# Altium PCB Charge Control-v2.0.0.PcbDoc
Units mil, origin at the board's own origin, x right, y up, seen from the top; angles counter-clockwise.
Board outline 984.25 x 1181.1 mil, 2 copper layers (Top Layer, Bottom Layer), stack 61.811 mil thick; 17 components, 11 nets, 51 pads, 37 vias.
Unrouted connection lines stored in the file: 10.
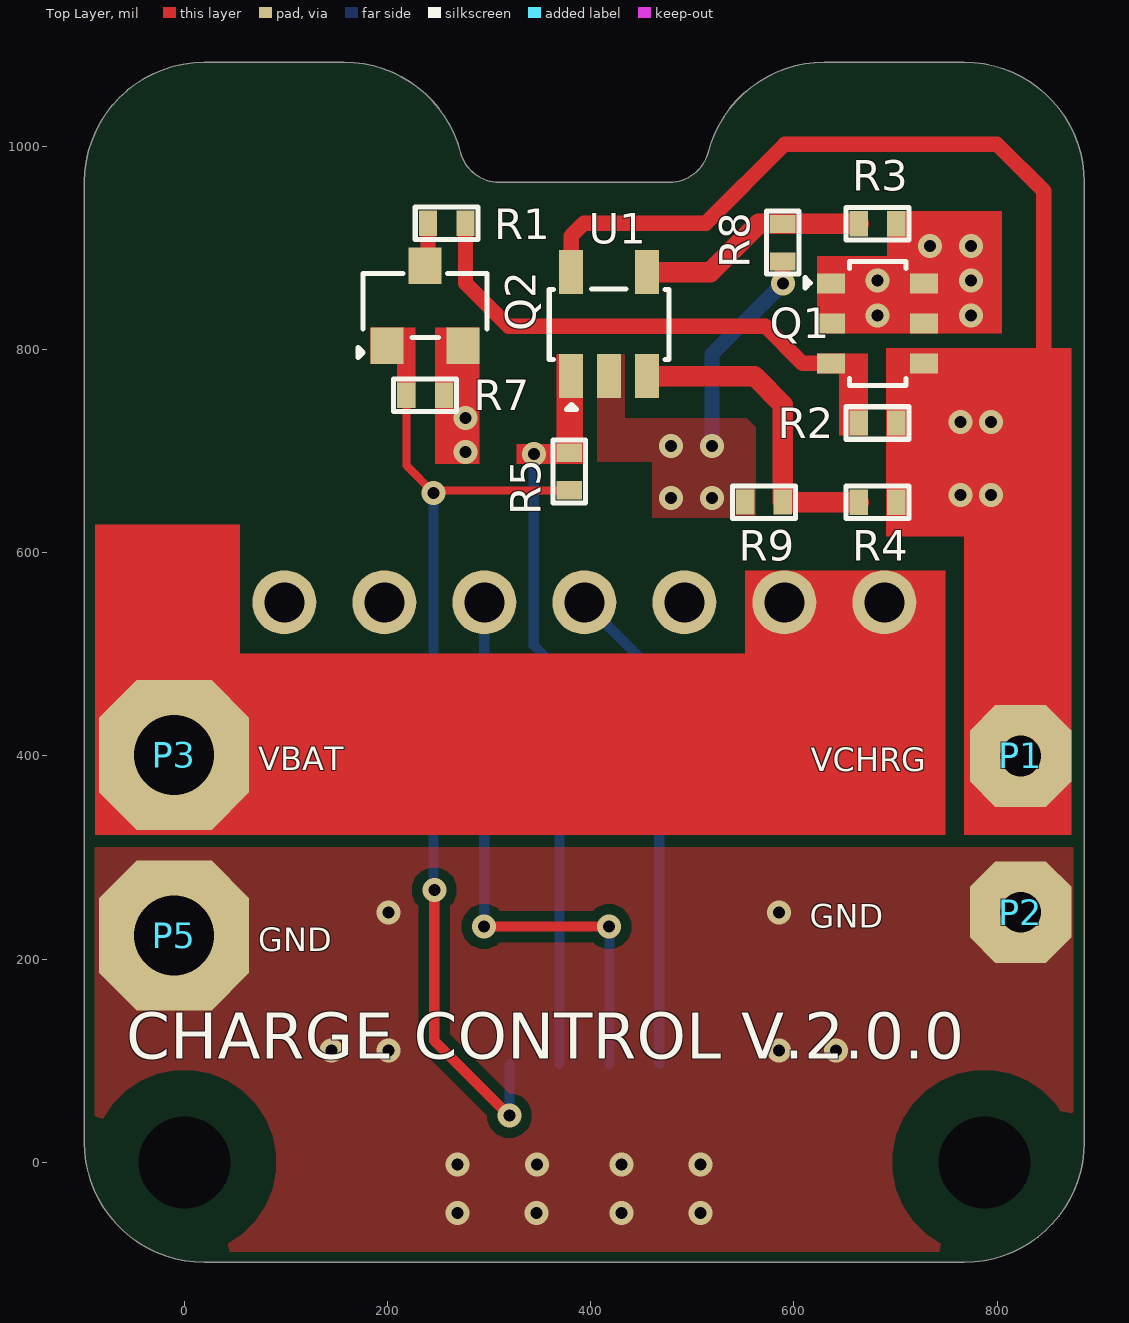
[diagram p0: Top Layer view]
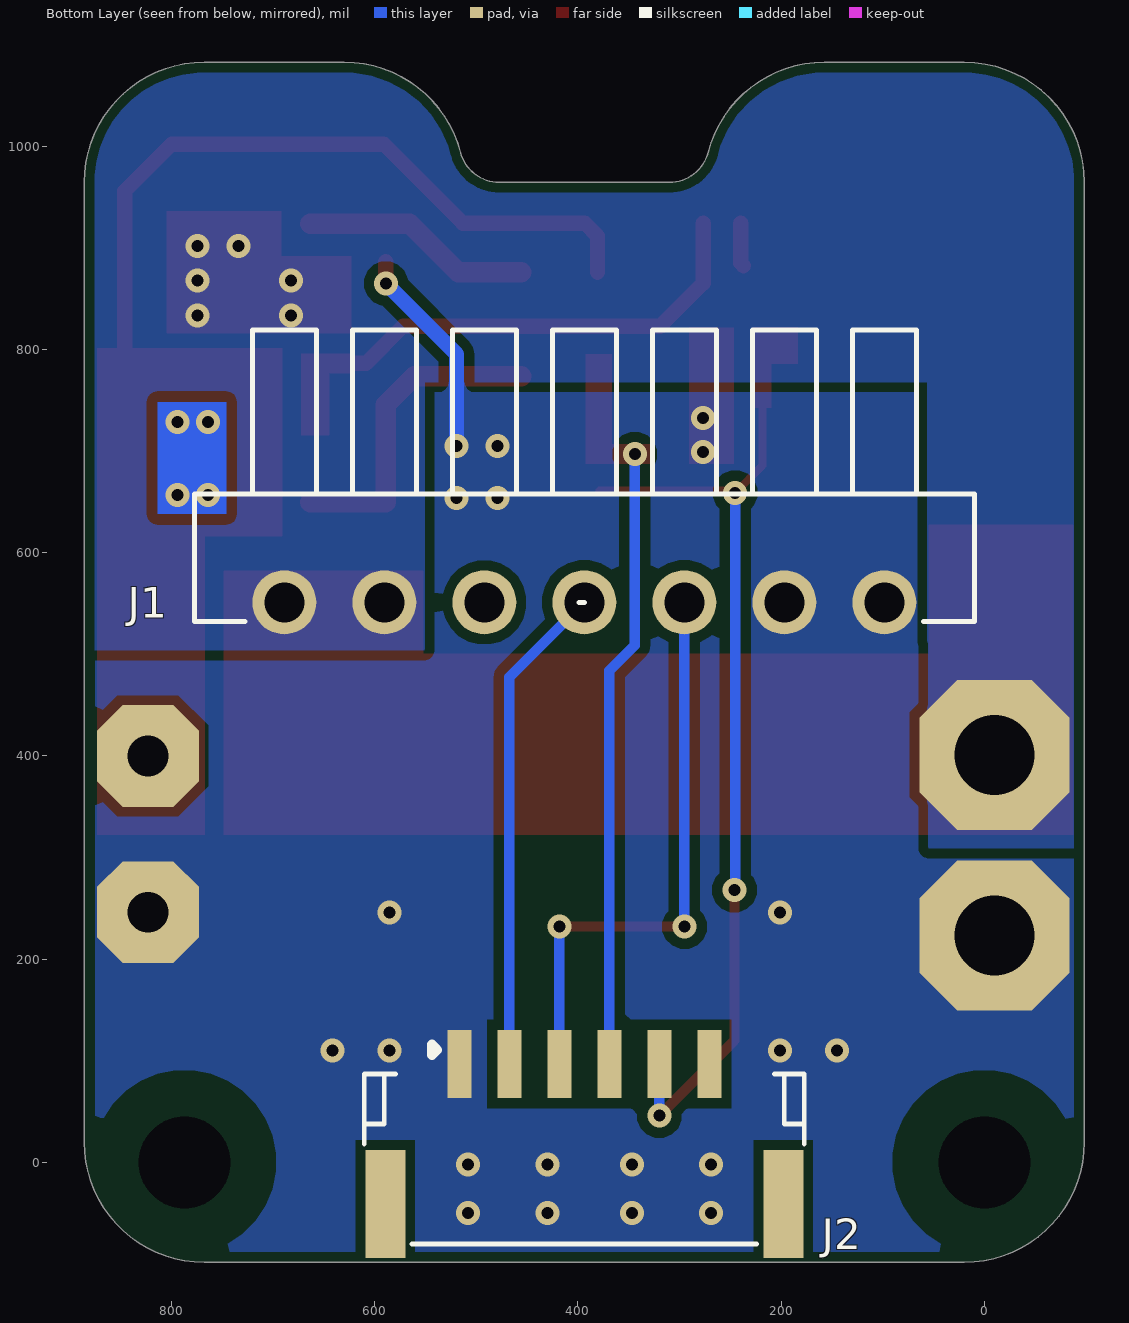
[diagram p1: Bottom Layer view, seen from below]
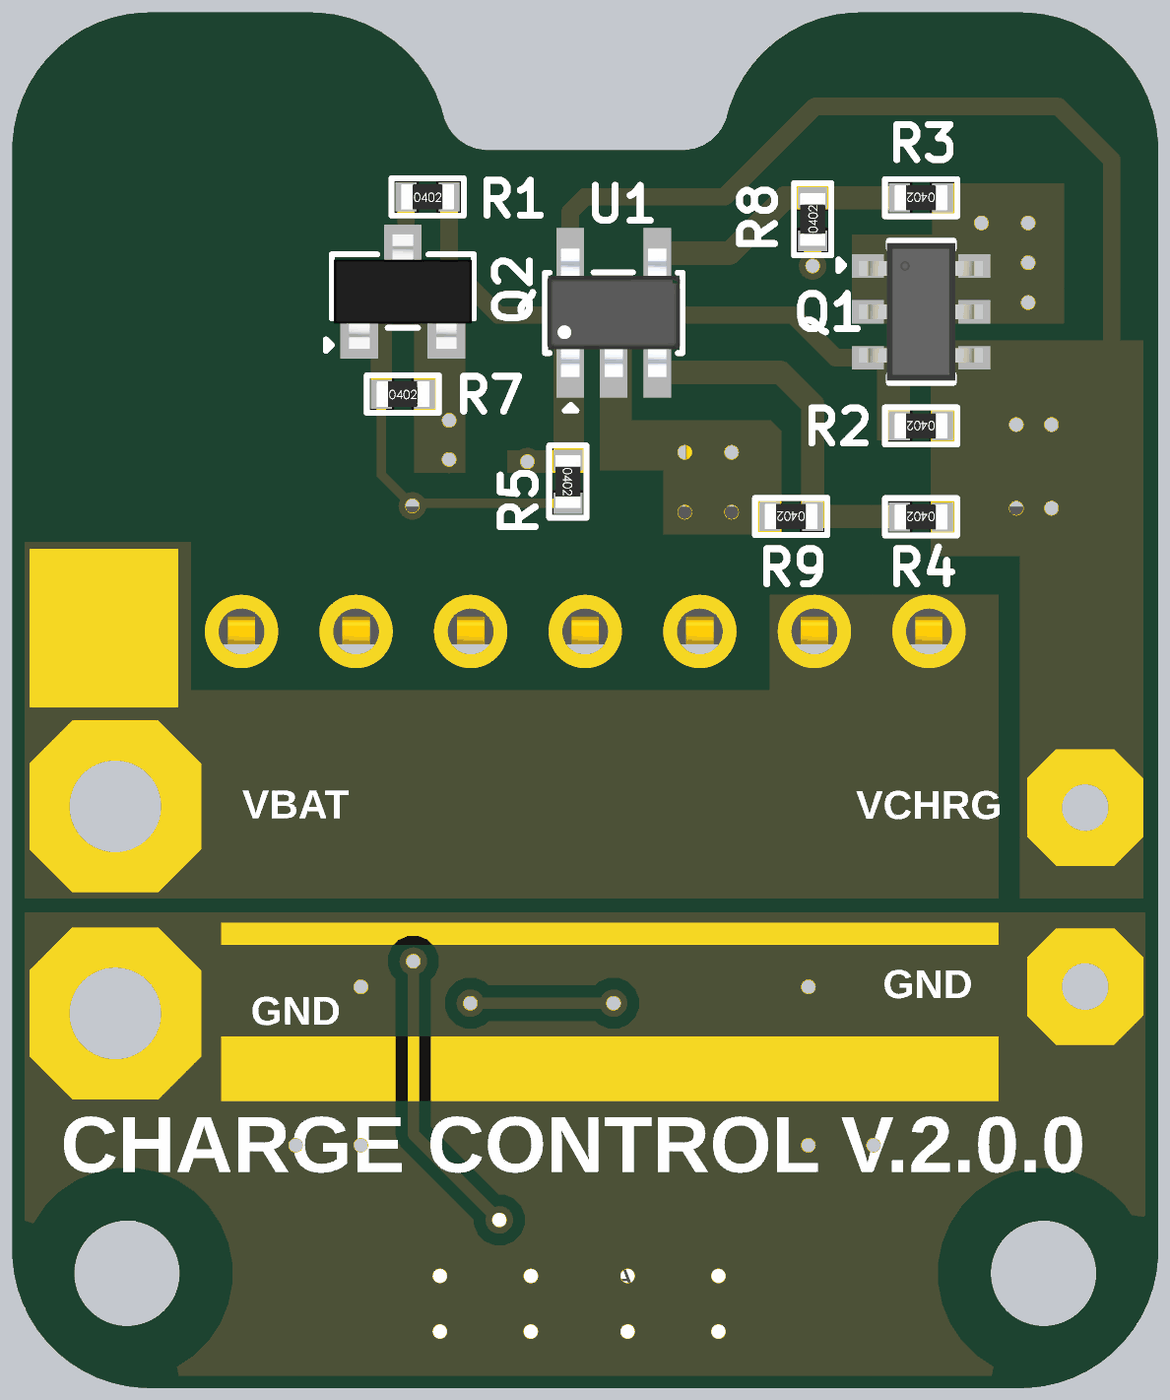
[diagram p2: 3D render of the assembled board from above, using the file's embedded part models]

## Layer stack, top to bottom
Top Solder: solder mask 0.3937, Solder Resist, Dk 3.5
Top Layer: signal copper 1.378
Dielectric 1: core 59.0551, FR-4, Dk 4.8
Bottom Layer: signal copper 1.378
Bottom Solder: solder mask 0.3937, Solder Resist, Dk 3.5

## Board outline
-98.43,19.69 -98.43,964.57 cw(c19.69,964.57) 19.69,1082.68 157.48,1082.68 cw(c157.48,964.57) 271.84,994.09 ccw(c309.96,1003.94) 309.96,964.57 477.44,964.57 ccw(c477.44,1003.94) 515.56,994.09 cw(c629.92,964.57) 629.92,1082.68 767.72,1082.68 cw(c767.72,964.57) 885.83,964.57 885.83,19.69 cw(c767.72,19.69) 767.72,-98.43 19.69,-98.43 cw(c19.69,19.69)

## Design rules (kind name [scope] priority, off if disabled: settings)
BoardOutlineClearance [All] p1: gap=0 ignorepadtopadclearanceinfootprint=FALSE except(10: Poly-OutlineEdge)
Clearance [All] p1: gap=10 ignorepadtopadclearanceinfootprint=FALSE
ComponentClearance [All] p1: gap=0 collisioncheckmode=3 verticalgap=0 showdistances=FALSE
HoleToHoleClearance [All] p1: gap=0 allowstackedmicrovias=TRUE
MinimumSolderMaskSliver [All] p1: minsoldermaskwidth=0
PolygonConnect [All] p1: connectstyle=Direct reliefconductorwidth=10 reliefentries=4 polygonreliefangle="90 Angle" airgapwidth=10
RoutingVias [All] p1: holewidth=11.81 width=23.62 viastyle="Through Hole" minholewidth=11.81 minwidth=23.62 maxholewidth=11.81 maxwidth=23.62
SilkToSilkClearance [All] p1: silktosilkclearance=0
SilkToSolderMaskClearance [IsPad] p1: minsilkscreentomaskgap=0 clearancetoexposedcopper=TRUE
SolderMaskExpansion Via [IsVia] p1: expansion=4 istentingtop=TRUE
UnRoutedNet [All] p1: checkbadconnections=TRUE
Width [All] p1: maxlimit=25 minlimit=8 preferedwidth=10 minimp=50.000000 maximp=50.000000 favimp=50.000000
24 further rules are at their usual default settings.

## Components (designator, comment, footprint, x,y, rotation, side; value= is the part's Value field where it differs from the comment)
J1 "B01-A-7P-R4-male" B01-A-7P-R4-MALE 393.7,551.18 r0 bottom locked
J2 "SM06B-GHS-TB(LF)(SN)" SM06B-GHS-TB(LF)(SN) 393.7,27.8 r180 bottom
P1 "Wirepad 2.54/1.0" "Wirepad 2.54/1.0"#1 823.19,419.65 r0 top
P2 "Wirepad 2.54/1.0" "Wirepad 2.54/1.0"#2 980.67,265.91 r0 top
P3 "Wire Pad 3.75/2.0" "Wire Pad 3.75/2.0" -10,401 r180 top
P5 "Wire Pad 3.75/2.0" "Wire Pad 3.75/2.0" -10,223.15 r180 top
Q1 "IRLTS2242TRPBF" 6-TSOP_ 682.19,825.65 r0 top value=55MR
Q2 "2N7002KT1G" SOT-23 237,843 r0 top
R1 "10K" Res-0402 258.26,924.37 r0 top
R2 "100K" Res-0402 682.19,727.65 r180 top
R3 "100K" Res-0402 682.19,923.65 r180 top
R4 "100K" Res-0402 682.19,649.65 r180 top
R5 "100K" Res-0402 378.76,679.87 r270 top
R7 "100K" Res-0402 237,755 r0 top
R8 "97.6K" Res-0402 589.05,905.15 r90 top
R9 "100K" Res-0402 570.55,649.87 r180 top
U1 "TLV271IDBVR" SOT-23-5 418.16,824.87 r90 top

## Footprints (in the part's own frame and the unit in brackets; to place one, negate y for a bottom-side part, rotate by r counter-clockwise, add the part's x,y. Pads: shape width x height; smd on the part's side, far side on the other; paste and mask are expansions set on the pad)
6-TSOP_ [mil]
  rect 27.52x20 smd: 1(-45.77,39.41) 2(-45.77,0) 3(-45.77,-39.41) 4(45.77,-39.41) 5(45.77,0) 6(45.77,39.41)
  silkscreen extent -71,-61 28,61, body extent -53,-59 53,59, height 39
B01-A-7P-R4-MALE [mm]
  round 1.6 hole 1: 1(-7.5,0) 2(-5,0) 3(-2.5,0) 4(0,0) 5(2.5,0) 6(5,0) 7(7.5,0)
  silkscreen extent -9.75,-6.81 9.75,0.48, body extent -9.75,-6.82 9.75,0.28, height 4.02
Res-0402 [mil]
  rect 18x25 smd mask+2.17: 1(-18.5,0) 2(18.5,0)
  silkscreen extent -32,-17 32,16, body extent -23,-11 23,11, height 16
SM06B-GHS-TB(LF)(SN) [mm]
  rect 0.6x1.7 smd paste+0 mask+0.051: 1(-3.125,1.749) 2(-1.876,1.749) 3(-0.625,1.749) 4(0.625,1.749) 5(1.875,1.749) 6(3.124,1.749)
  rect 1x2.7 smd paste+0 mask+0.051: MP1(-4.975,-1.749) MP2(4.975,-1.749)
  silkscreen extent -5.5,-2.75 5.5,2.23, body extent -5.38,-2.68 5.37,2.18, height 4.26
SOT-23 [mm] "TRANS NPN 40V 0.6A SOT23"
  rect 0.82x0.92 smd: 1(-0.95,-1) 2(0.95,-1) 3(0,1)
  silkscreen extent -1.68,-1.3 1.55,0.81, body extent -1.5,-1.25 1.5,1.25, height 1.05
SOT-23-5 [mm]
  rect 1.1x0.6 smd: 1(-1.3,0.95) 2(-1.3,0) 3(-1.3,-0.95) 4(1.3,-0.95) 5(1.3,0.95)
  silkscreen extent -2.13,-1.5 0.88,1.5, body extent -1.4,-1.45 1.4,1.45, height 1.45
"Wire Pad 3.75/2.0" [mm]
  oct 3.75x3.75 hole 2: 1(0,0)
"Wirepad 2.54/1.0"#1 [mil]
  oct 100x100 hole 40: 1(0,-19.69)
"Wirepad 2.54/1.0"#2 [mil]
  oct 100x100 hole 40: 1(-157.48,-19.69)

## Part data
J1: "7 Pin Blade RA Male Connector", LCSC Part Number=-, MAnufacturer=RTLECS, Package=Custom, ComponentLink1Description=LCSC, Item Type="Blade Connector", Manufacturer Part Number=B01-A-7P-R4-male
J2: "CONN HEADER SMD R/A 6POS 1.25MM", Current Rating=1A, Flammability Rating="UL94 V-0", Insulation Color=Natural, LCSC Part Number=C133065, MAnufacturer=JST, Max Operating Temperature=85°C, Min Operating Temperature=-25°C, Voltage Rating=50V, ComponentLink1Description=https://datasheet.ciiva.com/25617/0900766b810cef18-25617251.pdf?src-supplier=Rs, ComponentLink1URL=https://datasheet.ciiva.com/25617/0900766b810cef18-25617251.pdf?src-supplier=Rs, ComponentLink2Description=https://datasheet.ciiva.com/16487/jstsm06b-ghs-tb-lf-sn-16487196.pdf?src-supplier=Future+Electronics, ComponentLink2URL=https://datasheet.ciiva.com/16487/jstsm06b-ghs-tb-lf-sn-16487196.pdf?src-supplier=Future+Electronics, Connector type=Header, Contact Finish - Mating=TIN, Contact Material=Bronze, Contact Shape=Rectangular, Contact Type="Outer Shroud Contact", Fastening Type=Ramp, Insulation Material=Nylon, Item Type=Headers, Lead Free="Lead Free", Manufacturer Part Number=SM06B-GHS-TB(LF)(SN), Mounting Technology="Surface Mount", Number of Contacts=6, Number of Positions=6, Number of Rows=1, Orientation="Right Angle", Packaging="Cut Tape", Pitch=1.25mm, Pricing="2500=0.25, 5000=0.245, 7500=0.24, 10000=0.235 (USD)", RoHS=Yes, Series=GH, Supplier="Future Electronics", Termination=Solder
P3 P5: "Wire Connecting Pad 3.75/2.0"
Q1: "MOSFET P-CH 20V 6.9A 6TSOP", Drain to Source Breakdown Voltage=-20V, Drain to Source Resistance=26mR, LCSC Part Number=C538190, MAnufacturer=Infineon, On-State Resistance=-32mR, Package Quantity=3000NUMBER, Power Dissipation=2W, ComponentLink1Description=http://www.farnell.com/datasheets/1911990.pdf?src-supplier=Farnell, ComponentLink1URL=http://www.farnell.com/datasheets/1911990.pdf?src-supplier=Farnell, ComponentLink2Description=http://www.farnell.com/datasheets/1911990.pdf?src-supplier=Element14, ComponentLink2URL=http://www.farnell.com/datasheets/1911990.pdf?src-supplier=Element14, ComponentLink3Description=https://datasheet.octopart.com/IRLTS2242TRPBF-Infineon-datasheet-41193307.pdf?src-supplier=Newark, ComponentLink3URL=https://datasheet.octopart.com/IRLTS2242TRPBF-Infineon-datasheet-41193307.pdf?src-supplier=Newark, ComponentLink4Description=https://www.infineon.com/dgdl/irlts2242pbf.pdf?fileId=5546d462533600a401535671e9a12718&src-supplier=Digikey, ComponentLink4URL=https://www.infineon.com/dgdl/irlts2242pbf.pdf?fileId=5546d462533600a401535671e9a12718&src-supplier=Digikey, ComponentLink5Description=https://datasheet.octopart.com/IRLTS2242TRPBF-Infineon-datasheet-11534477.pdf?src-supplier=Farnell, ComponentLink5URL=https://datasheet.octopart.com/IRLTS2242TRPBF-Infineon-datasheet-11534477.pdf?src-supplier=Farnell, Element Configuration=5460ElementConfiguration, Fall Time=68ns, Height=1.3mm, Item Type=MOSFETs, Length=3mm, Manufacturer Part Number=IRLTS2242TRPBF, Number of Channels=1NUMBER, Number of Elements=1NUMBER, Pricing="1=0.44, 10=0.372, 50=0.372, 100=0.259, 1000=0.164, 10000=0.129 (USD)", Radiation Hardening=5898YesNo, RoHS=Yes, Stock=67736, Supplier=Mouser, Turn-Off Delay Time=18ns, Turn-On Delay Time=5.8ns, Width=1.75mm
Q2: "MOSFET N-CH 60V 320MA SOT23-3", Case/Package=SOT-23-3, Continuous Drain Current (ID)=320mA, Drain to Source Breakdown Voltage=60V, Drain to Source Resistance=1.6R, Gate to Source Voltage (Vgs)=20V, Input Capacitance=24.5pF, LCSC Part Number=C116584, MAnufacturer="ON Semiconductor", Max Operating Temperature=150°C, Max Power Dissipation=420mW, Min Operating Temperature=-55°C, Package Quantity=1, Power Dissipation=300mW, Supplier Part Number=3445699, Threshold Voltage=2.3V, Category=MOSFETs, ComponentLink1Description=https://datasheet.ciiva.com/1254/2n7002k-d-1254499.pdf?src-supplier=Newark, ComponentLink1URL=https://datasheet.ciiva.com/1254/2n7002k-d-1254499.pdf?src-supplier=Newark, ComponentLink2Description=https://datasheet.ciiva.com/16220/2n7002k-d-16220919.pdf?src-supplier=Future+Electronics, ComponentLink2URL=https://datasheet.ciiva.com/16220/2n7002k-d-16220919.pdf?src-supplier=Future+Electronics, ComponentLink3Description=https://datasheet.ciiva.com/936/2n7002k-d-936793.pdf?src-supplier=Digikey, ComponentLink3URL=https://datasheet.ciiva.com/936/2n7002k-d-936793.pdf?src-supplier=Digikey, Contact Plating=Tin,Matte, Drain-source On Resistance-Max=1.6R, Element Configuration=Single, Fall Time=9ns, Halogen Free="Halogen Free", Height=1.01mm, Item Type=MOSFET, Lead Free="Lead Free", Length=3.04mm, Manufacturer Part Number=2N7002KT1G, Nominal Vgs=2.3V, Number of Channels=1NUMBER, Number of Elements=1, Packaging="Tape and Reel", Pins=3, Polarity=N-CHANNEL, Pricing="3000=0.0238, 12000=0.0228, 45000=0.0218, 75000=0.0215, 150000=0.0204 (USD)", Radiation Hardening=No, Rds On Max=1.6R, Reach SVHC Compliant=No, Rise Time=9ns, RoHS=Yes, RoHS Compliant=Yes, Series=-, Stock=51000, Supplier="Future Electronics", Turn-Off Delay Time=55.8ns, Turn-On Delay Time=12.2ns, Width=1.4mm
R1: library part RC0402FR-0710KL, "RES 10K OHM 1% 1/16W 0402", Case Code (Imperial)=0402, Case Code (Metric)=1005, LCSC Part Number=C60490, MAnufacturer=Yageo, Max Operating Temperature=155°C, Max Power Dissipation=63mW, Min Operating Temperature=-55°C, Power Rating=62.5mW, Resistance=10kR, Resistance Tolerance=1%, Resistor Type="Thick Film", Supplier Part Number 1=603-RC0402FR-0710KL, Temperature Coefficient=100ppm/°C, Voltage Rating=50V, Case/Package=0402, Category="Chip SMD Resistors", ComponentLink1Description=https://datasheet.ciiva.com/7660/38568-7660787.pdf?src-supplier=Element14, ComponentLink1URL=https://datasheet.ciiva.com/7660/38568-7660787.pdf?src-supplier=Element14, ComponentLink2Description=https://datasheet.ciiva.com/7849/1686128-7849814.pdf?src-supplier=Element14, ComponentLink2URL=https://datasheet.ciiva.com/7849/1686128-7849814.pdf?src-supplier=Element14, ComponentLink3Description=https://datasheet.ciiva.com/7983/1018594-7983486.pdf?src-supplier=Element14, ComponentLink3URL=https://datasheet.ciiva.com/7983/1018594-7983486.pdf?src-supplier=Element14, ComponentLink4Description=https://datasheet.ciiva.com/22747/1018594-22747512.pdf?src-supplier=Element14, ComponentLink4URL=https://datasheet.ciiva.com/22747/1018594-22747512.pdf?src-supplier=Element14, ComponentLink5Description=https://datasheet.ciiva.com/12667/pyu-rc0402-51-rohs-l-6-r-12667067.pdf?src-supplier=Mouser, ComponentLink5URL=https://datasheet.ciiva.com/12667/pyu-rc0402-51-rohs-l-6-r-12667067.pdf?src-supplier=Mouser, ComponentLink6Description=https://datasheet.ciiva.com/7849/1784430-7849813.pdf?src-supplier=Element14, ComponentLink6URL=https://datasheet.ciiva.com/7849/1784430-7849813.pdf?src-supplier=Element14, ComponentLink7Description=https://datasheet.ciiva.com/7849/1784430-7849815.pdf?src-supplier=Element14, ComponentLink7URL=https://datasheet.ciiva.com/7849/1784430-7849815.pdf?src-supplier=Element14, Construction=Rectangular, Depth=0.5mm, Features="Moisture Resistant", Height=0.32mm, Item Type=Resistor, Lead Free="Lead Free", Lead Pitch=0.2mm, Length=1mm, Manufacturer Part Number=RC0402FR-0710KL, Military Standard=Not, Number of Pins=2, Number of Terminations=2, Packaging="Tape and Reel", Pricing 1="1=0.10000, 10=0.01400, 50=0.01400, 100=0.00500, 1000=0.00300, 10000=0.00200 (USD)", REACH SVHC="No SVHC", RoHS=Yes, RoHS Compliant=Yes, Series=RC, Stock 1=18648329, Supplier 1=Mouser, Termination=SMD/SMT, Tolerance=1%, Voltage Rating (DC)=50V, Width=0.5mm, Working Voltage=50V
R2 R3 R4 R5 R7 R9: library part RC0402FR-07100KL, "RES 100K OHM 1% 1/16W 0402", Case Code (Imperial)=0402, Case Code (Metric)=1005, LCSC Part Number=C60491, MAnufacturer=Yageo, Max Operating Temperature=155°C, Max Power Dissipation=63mW, Min Operating Temperature=-55°C, Package Quantity=1, Resistance=100kR, Resistance Tolerance=1%, Resistor Type="Thick Film", Supplier Part Number 1=603-RC0402FR-07100KL, Temperature Coefficient=100ppm/°C, Voltage Rating=50V, Case/Package=0402, Category="Chip SMD Resistors", ComponentLink1Description=https://datasheet.ciiva.com/11819/0900766b80c66297-11819452.pdf?src-supplier=RSComponents, ComponentLink1URL=https://datasheet.ciiva.com/11819/0900766b80c66297-11819452.pdf?src-supplier=RSComponents, ComponentLink2Description=https://datasheet.ciiva.com/22747/1018594-22747509.pdf?src-supplier=Element14, ComponentLink2URL=https://datasheet.ciiva.com/22747/1018594-22747509.pdf?src-supplier=Element14, ComponentLink3Description=https://datasheet.ciiva.com/2453/pyu-r-int-thick-7-2453362.pdf?src-supplier=Digi-Key, ComponentLink3URL=https://datasheet.ciiva.com/2453/pyu-r-int-thick-7-2453362.pdf?src-supplier=Digi-Key, ComponentLink4Description=https://datasheet.ciiva.com/2453/pyu-r-int-thick-7-2453363.pdf?src-supplier=Digi-Key, ComponentLink4URL=https://datasheet.ciiva.com/2453/pyu-r-int-thick-7-2453363.pdf?src-supplier=Digi-Key, ComponentLink5Description=https://datasheet.ciiva.com/2453/pyu-r-int-thick-7-2453361.pdf?src-supplier=Digi-Key, ComponentLink5URL=https://datasheet.ciiva.com/2453/pyu-r-int-thick-7-2453361.pdf?src-supplier=Digi-Key, ComponentLink6Description=https://datasheet.ciiva.com/12667/pyu-rc0402-51-rohs-l-6-r-12667930.pdf?src-supplier=Mouser, ComponentLink6URL=https://datasheet.ciiva.com/12667/pyu-rc0402-51-rohs-l-6-r-12667930.pdf?src-supplier=Mouser, ComponentLink7Description=https://datasheet.ciiva.com/15189/getdatasheetpartid-323696-15189334.pdf?src-supplier=Verical, ComponentLink7URL=https://datasheet.ciiva.com/15189/getdatasheetpartid-323696-15189334.pdf?src-supplier=Verical, Construction=Rectangular, Depth=0.5mm, Features="Moisture Resistant", Height=0.016inch, Item Type=Resistor, Lead Free="Lead Free", Length=0.039inch, Manufacturer Part Number=RC0402FR-07100KL, Military Standard=Not, Number of Terminations=2, Packaging="Tape and Reel", Power Rating=63mW, Pricing 1="1=0.10000, 10=0.01200, 50=0.01200, 100=0.00500, 1000=0.00300, 2500=0.00200, 10000=0.00100 (USD)", REACH SVHC="No SVHC", RoHS=Yes, RoHS Compliant=Yes, Series=RC, Stock 1=7759549, Supplier 1=Mouser, Technology="THICK FILM", Termination=SMD/SMT, Tolerance=1%, Width=0.02inch, Working Voltage=50V
R8: library part RT0402BRD0797K6L, "RES SMD 97.6KOHM 0.1% 1/16W 0402", LCSC Part Number=C852964, MAnufacturer=Yageo, Voltage Rating (DC)=50V, ComponentLink1Description=https://datasheet.ciiva.com/2582/pyu-rt-1-to-0-05-rohs-l-5-2582537.pdf?src-supplier=Digikey, ComponentLink1URL=https://datasheet.ciiva.com/2582/pyu-rt-1-to-0-05-rohs-l-5-2582537.pdf?src-supplier=Digikey, Item Type=Resistors, Lead Free=5697LeadFree, Manufacturer Part Number=RT0402BRD0797K6L, Pricing="1=0.0267, 10=0.0191, 25=0.0164, 100=0.0148, 250=0.0132 (USD)", RoHS=Yes, Stock=301, Supplier="Arrow Electronics"
U1: "IC CMOS 1 CIRCUIT SOT23-5", LCSC Part Number=C181500, MAnufacturer="Texas Instruments", ComponentLink1Description=https://datasheet.ciiva.com/7848/1772259-7848320.pdf?src-supplier=Element14, ComponentLink1URL=https://datasheet.ciiva.com/7848/1772259-7848320.pdf?src-supplier=Element14, ComponentLink2Description=https://datasheet.ciiva.com/1796/tlv271-1796326.pdf?src-supplier=Digikey, ComponentLink2URL=https://datasheet.ciiva.com/1796/tlv271-1796326.pdf?src-supplier=Digikey, ComponentLink3Description=https://datasheet.ciiva.com/1796/tlv271-1796327.pdf?src-supplier=Digikey, ComponentLink3URL=https://datasheet.ciiva.com/1796/tlv271-1796327.pdf?src-supplier=Digikey, ComponentLink4Description=https://datasheet.ciiva.com/1796/tlv271-1796328.pdf?src-supplier=Digikey, ComponentLink4URL=https://datasheet.ciiva.com/1796/tlv271-1796328.pdf?src-supplier=Digikey, ComponentLink5Description=https://datasheet.ciiva.com/2974/slos351d-2974433.pdf?src-supplier=Avnet, ComponentLink5URL=https://datasheet.ciiva.com/2974/slos351d-2974433.pdf?src-supplier=Avnet, ComponentLink6Description=https://datasheet.ciiva.com/2974/slos351d-2974434.pdf?src-supplier=Avnet, ComponentLink6URL=https://datasheet.ciiva.com/2974/slos351d-2974434.pdf?src-supplier=Avnet, ComponentLink7Description=https://datasheet.ciiva.com/46383/1882561-46383869.pdf?src-supplier=Element14, ComponentLink7URL=https://datasheet.ciiva.com/46383/1882561-46383869.pdf?src-supplier=Element14, Item Type=Opam, Manufacturer Part Number=TLV271IDBVR, Pricing="1=0.9, 10=0.761, 50=0.761, 100=0.585, 1000=0.408, 10000=0.347 (USD)", RoHS=Yes, Stock=23196, Supplier=Mouser

## Free pads (board coordinates)
  round 0 hole 90.55 unplated: MH(787.4,0) MH1(0,0)

## Via types
v1: diameter 23.62, hole 11.81, Top Layer to Bottom Layer, tented both sides, 37 vias

## Nets (pads, with @x,y where several pads share a name; then routed paths per layer and width w, separated by ;. In a path a pad name is that pad's centre, name@x,y a point inside that pad or via, vN(x,y) a via of type N, cw(c..) or ccw(c..) an arc to the next point about the centre after c; other vN are vias at no path point)
+Vref: R4.2 R9.1 U1.3 | length 315.7
  Top Layer w20: U1.3 561.23,773.69 589.05,745.88 R9.1 589.17,649.76 663.57,649.76 R4.2
CH_EN: J2.4 R5.1 U1.1 | length 610.7
  Bottom Layer w10: v1(344,697) 344,509 350,503 369.11,483.89 J2.4
Gate_CHG+: Q1.3 R1.2 R2.2 | length 451.5
  Top Layer w15: R1.2 276.76,865.24 319.09,822.91 572.03,822.91 608.58,786.37 630.16,786.37 630.29,786.24 Q1.3
GND: J1.1 J1.2 J2.1 P2.1 P5.1 Q2.2 R7.2 R8.1 R9.2 U1.2 | length 210.5
  Top Layer w15: v1(589.05,865.06) R8.1
  Bottom Layer w15: v1(519.4,705) 519.4,795.4 v1(589.05,865.06)
  other v1: 268.87,-50 346.87,-50 430.13,-50 508.13,-50 268.87,-2.2 346.97,-2.27 430.13,-2.2 508.13,-2.2 145,110 201,110 585.38,110 641.38,110 201,246 585.38,246 479.19,653.65 519.4,653.65 276.76,698.91 479.19,705 276.76,732.53
GPIO18: J2.5 Q2.1 R5.2 R7.1 | length 935.4
  Top Layer w8: R7.1 218.5,685.69 v1(245.19,659) ; v1@245.19,661.37 R5.2
  Top Layer w10: v1(246,268) 246,119.8 v1(319.9,45.9)
  Bottom Layer w10: v1(245.19,659) 245.19,268.81 v1(246,268) ; v1(319.9,45.9) J2.5
NetQ2_3: Q2.3 R1.1 | length 43.1
  Top Layer w15: Q2.3 239.76,885.13 R1.1
NetR3_2: R3.2 R8.2 U1.4 | length 227.8
  Top Layer w20: U1.4 517.81,876.06 565.4,923.65 R8.2 R3.2
SCL: J1.3 J2.3 | length 577.8
  Top Layer w10: v1(295,232) v1(418,232)
  Bottom Layer w10: v1(295,232) 295.28,232.28 J1.3 ; v1(418,232) 418.32,231.68 J2.3
SDA: J1.4 J2.2 | length 485.1
  Bottom Layer w10: J1.4 467.52,477.36 467.52,354.65 J2.2
VBAT: J1.6 J1.7 P3.1 Q1.1 Q1.2 Q1.5 Q1.6 R3.1
  other v1: 682.19,833.65 774.19,833.65 682.19,867.82 774.19,867.82 733.96,902 774.19,902
Vcharge+: P1.1 Q1.4 R2.1 R4.1 U1.5 | length 1011.8
  Top Layer w15: U1.5 380.76,911.83 393.29,924.37 513.37,924.37 591,1002 800,1002 846,956 846,708.64 846,543.79 820.19,517.98 ; 828,700 832,696
  other v1: 764,657 794.19,657 764,728.8 794.19,728.8
pads on no net: J1.5 J2.6 J2.MP1 J2.MP2

## Polygon pours and split planes (outlines as drawn)
GND on Top Layer "NONET_L-01_P-001" (solid, pour order 5): 513,310 749,310 875,310 875,5.53 cw(c796.48,5.52) 852,-50 842.29,-59.71 cw(c771.58,11) 771.58,-89 15.42,-89 cw(c15.42,11) -55.29,-59.71 -58.71,-56.29 cw(c12,14.42) -88,14.42 -88,310
GND on Top Layer "NONET_L-01_P-001" (solid, pour order 1): 406.35,795.35 406.35,689.37 460.63,689.37 460.63,634.65 562.19,634.65 562.19,723.74 553.39,732.53 433.59,732.53 433.59,795.35
GND on Bottom Layer "NONET_L-01_P-001" (solid, remove dead copper, pour order 2): 554,768 554,503.8 874.94,503.8 874.94,50.55 874.94,9.4 cw(c790.21,9.39) 850.26,-50.38 840.98,-59.66 cw(c770.11,11.2) 770.11,-89.01 15.82,-89.01 cw(c15.82,10.99) -57.41,-57.11 cw(c8.26,13.58) -88.23,13.58 -88.23,309 56,309 56,768
VBAT on Bottom Layer "NONET_L-01_P-001" (solid, pour order 0): 551,768 551,503.8 885.83,503.8 885.83,972.31 884.82,979.98 883.81,987.66 881.8,995.14 876.84,1009.77 873.87,1016.92 866.13,1030.33 856.71,1042.61 851.23,1048.08 845.76,1053.56 833.48,1062.98 820.07,1070.72 805.72,1076.5 798.29,1078.65 790.81,1080.66 787.61,1081.08 610.55,1081.08 600.93,1079.48 582.47,1073.17 565.3,1063.91 549.88,1051.97 543.26,1044.81 536.63,1037.66 525.91,1021.37 518,1003.54 514.62,990.99 510.21,982.36 506.23,977.28 498.91,970.93 490.14,966.81 479.06,964.63 468.43,964.57 324.68,964.57 306.72,964.7 297.26,966.81 291.35,969.4 288.49,970.93 281.17,977.28 275.41,985.07 272.78,990.99 269.4,1003.54 261.49,1021.37 256.13,1029.51 244.14,1044.81 240.79,1048.17 ccw(c157.5,964.92) 157.48,1082.68 29.53,1082.68 11.94,1082.68 -3.41,1080.66 -18.36,1076.65 -25.51,1073.69 -32.67,1070.72 -39.37,1066.85 -46.07,1062.98 -52.22,1058.27 -58.36,1053.56 -69.31,1042.61 -78.73,1030.33 -82.6,1023.62 -86.47,1016.92 -89.44,1009.77 -94.4,995.14 -96.4,987.66 -97.42,979.98 -98.43,972.31 -98.43,309 56,309 56,768

## Other copper
Top Layer:
  rectangle net Vcharge+: 690.59,637.15 805,801.28
  rectangle net VBAT: -88,441 55,628
  rectangle net VBAT: 552.05,322 749,582.68
  rectangle net VBAT: -88,322 749,501
  rectangle net CH_EN: 326.77,687.37 391.26,707
  rectangle net CH_EN: 366.26,687.37 392.57,795.35
  rectangle net Vcharge+: 767.18,322 873.19,705.95
  rectangle net Vcharge+: 690.59,616 873.19,801.28
  region net GPIO18: 209.5,821.74 209.5,742.5 227.5,742.5 227.5,821.74
  region net GND: 246.5,821.74 246.5,687.31 290.54,687.31 290.54,821.74
  rectangle net Gate_CHG+: 622.66,776.24 672.69,796.24
  region net GPIO18: 183.46,821.74 183.46,785.52 227.5,785.52 227.5,821.74
  rectangle net Gate_CHG+: 644.47,715.15 672.69,796.24
  rectangle net VBAT: 691.69,815.65 805,936.15
  rectangle net VBAT: 622.66,815.65 792,892
  pour cut-out: 787.4,-90.55 cw(c787.4,0) 696.85,0 cw(c787.4,0) 787.4,90.55 cw(c787.4,0) 877.95,0 cw(c787.4,0)
  pour cut-out: 0,-90.55 cw(c0,0) -90.55,0 cw(c0,0) 0,90.55 cw(c0,0) 90.55,0 cw(c0,0)
Bottom Layer:
  rectangle net Vcharge+: 746,637.88 813.97,748.54
  pour cut-out: 787.4,-90.55 cw(c787.4,0) 696.85,0 cw(c787.4,0) 787.4,90.55 cw(c787.4,0) 877.95,0 cw(c787.4,0)
  pour cut-out: 0,-90.55 cw(c0,0) -90.55,0 cw(c0,0) 0,90.55 cw(c0,0) 90.55,0 cw(c0,0)

## Silkscreen, mask and mechanical layers (free items; w line width, h text height)
Top Overlay:
  text "VBAT" at 72.53,378 h39.37
  text "VCHRG" at 616.48,376.89 h39.37
  text "GND" at 615.47,223.15 h39.37
  text "GND" at 72.53,200.09 h39.37
  text "CHARGE CONTROL V.2.0.0" at -57,87.07 h77.48
Top Solder:
  rectangle: -83.82,486 44.18,622
  rectangle: 81,148 749,203.22
  rectangle: 81,282 749,301
Board Outline:
  circle w5: c492.13,551.18 r29.53
  circle w5: c393.7,551.18 r29.53
  circle w5: c295.28,551.18 r29.53
  circle w5: c196.85,551.18 r29.53
  circle w5: c98.43,551.18 r29.53
  circle w5: c0,0 r45.28
  circle w5: c787.4,0 r45.28
  circle w5: c688.98,551.18 r29.53
  circle w5: c590.55,551.18 r29.53
  lines w5: -98.43,19.69 ccw(c19.69,19.69) 19.69,-98.43 767.72,-98.43 ccw(c767.72,19.69) 885.83,19.69 885.83,964.57 ccw(c767.72,964.57) 767.72,1082.68 629.92,1082.68 ccw(c629.92,964.57) 515.56,994.09 cw(c477.44,1003.94) 477.44,964.57 309.96,964.57 cw(c309.96,1003.94) 271.84,994.09 ccw(c157.48,964.57) 157.48,1082.68 19.69,1082.68 ccw(c19.68,964.57) -98.43,964.57 -98.43,19.69
Fabrication:
  drawing of 191 lines, arcs and shapes, not listed
  text "Layer" at 1377.5,1043.85 h60
  text "Name" at 1787.41,1043.85 h60
  text "Material" at 2717.16,1043.85 h60
  text "Thickness" at 3576.92,1043.85 h60
  text "Constant" at 4226.76,1043.85 h60
  text "Board Layer Stack" at 4796.62,1043.85 h60
  text "Top Overlay" at 1787.41,923.85 h60
  text "Top Solder" at 1787.41,803.85 h60
  text "Solder Resist" at 2717.16,803.85 h60
  text "0.010mm" at 3576.92,803.85 h60
  text "3.5" at 4226.76,803.85 h60
  text "1" at 1377.5,683.85 h60
  text "Top Layer" at 1787.41,683.85 h60
  text "0.035mm" at 3576.92,683.85 h60
  text "Dielectric 1" at 1787.41,563.85 h60
  text "FR-4" at 2717.16,563.85 h60
  text "1.500mm" at 3576.92,563.85 h60
  text "4.8" at 4226.76,563.85 h60
  text "2" at 1377.5,443.85 h60
  text "Bottom Layer" at 1787.41,443.85 h60
  text "0.035mm" at 3576.92,443.85 h60
  text "Bottom Solder" at 1787.41,323.85 h60
  text "Solder Resist" at 2717.16,323.85 h60
  text "0.010mm" at 3576.92,323.85 h60
  text "3.5" at 4226.76,323.85 h60
  text "Bottom Overlay" at 1787.41,203.85 h60
  text "Total board thickness:" at 1377.5,83.85 h60
  text "1.590mm" at 3576.92,83.85 h60
Drill Drawing:
  circle w10: c9.62,2190.83 r33.33
  lines w10: -23.71,1574.17 -7.04,1574.17 9.62,1557.5 26.29,1574.17 42.96,1574.17 26.29,1590.83 42.96,1607.5 26.29,1607.5 9.62,1624.17 -7.04,1607.5 -23.71,1607.5 -7.04,1590.83 -23.71,1574.17 ; -23.71,1707.5 42.96,1707.5 42.96,1774.17 -23.71,1774.17 -23.71,1707.5 ; -23.71,1924.17 42.96,1924.17 9.62,1857.5 -23.71,1924.17 ; -23.71,2007.5 9.62,2024.17 42.96,2007.5 26.29,2040.83 42.96,2074.17 9.62,2057.5 -23.71,2074.17 -7.04,2040.83 -23.71,2007.5
  lines w15: -83.5,1512.5 13010.83,1512.5 ; -83.5,2262.5 13010.83,2262.5 ; 467.38,1362.5 467.38,2412.5 ; 1007.24,1362.5 1007.24,2412.5 ; 2106.92,1362.5 2106.92,2412.5 ; 2612.79,1362.5 2612.79,2412.5 ; 3346.59,1362.5 3346.59,2412.5 ; 4846.14,1362.5 4846.14,2412.5 ; 5435.99,1362.5 5435.99,2412.5 ; 6181.79,1362.5 6181.79,2412.5 ; 7221.49,1362.5 7221.49,2412.5 ; 8075.25,1362.5 8075.25,2412.5 ; 9408.86,1362.5 9408.86,2412.5 ; 10742.47,1362.5 10742.47,2412.5 ; 11608.23,1362.5 11608.23,2412.5 ; -83.5,1362.5 13010.83,1362.5 13010.83,2412.5 -83.5,2412.5 -83.5,1362.5
  text "Symbol" at 6.5,2307.5 h72
  text "Count" at 512.38,2307.5 h72
  text "Hole Size" at 1052.24,2307.5 h72
  text "Plated" at 2151.92,2307.5 h72
  text "Hole Type" at 2657.79,2307.5 h72
  text "Drill Layer Pair" at 3391.59,2307.5 h72
  text "Via/Pad" at 4891.14,2307.5 h72
  text "Pad Shape" at 5480.99,2307.5 h72
  text "Template" at 6226.79,2307.5 h72
  text "Description" at 7266.49,2307.5 h72
  text "Hole Tolerance (+)" at 8120.25,2307.5 h72
  text "Hole Tolerance (-)" at 9453.86,2307.5 h72
  text "Hole Length" at 10787.47,2307.5 h72
  text "Routed Path Length" at 11653.23,2307.5 h72
  text "2" at 512.38,2157.5 h60
  text "1.016mm (40.00mil)" at 1052.24,2157.5 h60
  text "PTH" at 2151.92,2157.5 h60
  text "Round" at 2657.79,2157.5 h60
  text "Top Layer - Bottom Layer" at 3391.59,2157.5 h60
  text "Pad" at 4891.14,2157.5 h60
  text "Octagonal" at 5480.99,2157.5 h60
  text "s254h102c50m0mx0" at 6226.79,2157.5 h60
  text "-" at 10787.47,2157.5 h60
  text "-" at 11653.23,2157.5 h60
  text "2" at 512.38,2007.5 h60
  text "2.000mm (78.74mil)" at 1052.24,2007.5 h60
  text "PTH" at 2151.92,2007.5 h60
  text "Round" at 2657.79,2007.5 h60
  text "Top Layer - Bottom Layer" at 3391.59,2007.5 h60
  text "Pad" at 4891.14,2007.5 h60
  text "Octagonal" at 5480.99,2007.5 h60
  text "s375h200c50" at 6226.79,2007.5 h60
  text "-" at 10787.47,2007.5 h60
  text "-" at 11653.23,2007.5 h60
  text "2" at 512.38,1857.5 h60
  text "2.300mm (90.55mil)" at 1052.24,1857.5 h60
  text "NPTH" at 2151.92,1857.5 h60
  text "Round" at 2657.79,1857.5 h60
  text "Top Layer - Bottom Layer" at 3391.59,1857.5 h60
  text "Pad" at 4891.14,1857.5 h60
  text "Rounded" at 5480.99,1857.5 h60
  text "c0hn230m0mx0" at 6226.79,1857.5 h60
  text "-" at 10787.47,1857.5 h60
  text "-" at 11653.23,1857.5 h60
  text "7" at 512.38,1707.5 h60
  text "1.000mm (39.37mil)" at 1052.24,1707.5 h60
  text "PTH" at 2151.92,1707.5 h60
  text "Round" at 2657.79,1707.5 h60
  text "Top Layer - Bottom Layer" at 3391.59,1707.5 h60
  text "Pad" at 4891.14,1707.5 h60
  text "Rounded" at 5480.99,1707.5 h60
  text "c160h100m0mx0" at 6226.79,1707.5 h60
  text "-" at 10787.47,1707.5 h60
  text "-" at 11653.23,1707.5 h60
  text "37" at 512.38,1557.5 h60
  text "0.300mm (11.81mil)" at 1052.24,1557.5 h60
  text "PTH" at 2151.92,1557.5 h60
  text "Round" at 2657.79,1557.5 h60
  text "Top Layer - Bottom Layer" at 3391.59,1557.5 h60
  text "Via" at 4891.14,1557.5 h60
  text "Rounded" at 5480.99,1557.5 h60
  text "v60h30m0mx0" at 6226.79,1557.5 h60
  text "-" at 10787.47,1557.5 h60
  text "-" at 11653.23,1557.5 h60
  text "50 Total" at 512.38,1407.5 h60

## Dimensions
767.72,1082.68 to 767.72,-98.43 on Dimension
885.83,964.57 to -98.43,964.57 on Dimension